# Altium PCB PCB1.PcbDoc (part 2 of 2)
Units mil, origin at the board's own origin, x right, y up, seen from the top; angles counter-clockwise.
Board outline 6255 x 1985 mil, 4 copper layers (Top Layer, Mid Layer 1, Mid Layer 2, Bottom Layer), stack 61.811 mil thick; 94 components, 195 nets, 609 pads, 417 vias.
Unrouted connection lines stored in the file: 4.
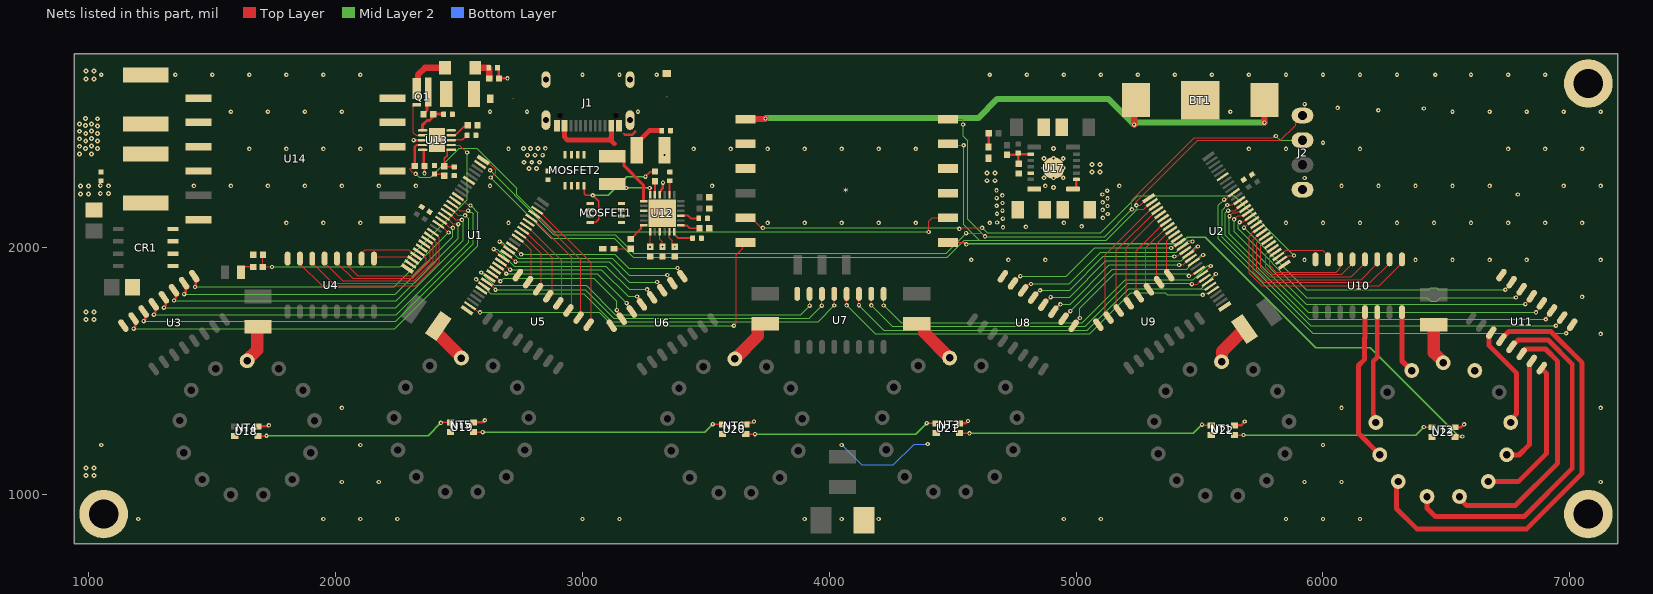
[diagram p4: the nets of this part, all layers, seen from the top]

## Via types
v1: diameter 17.72, hole 7.87, Top Layer to Bottom Layer, tented both sides, 331 vias
v2: diameter 19.68, hole 7.87, Top Layer to Bottom Layer, tented both sides, 75 vias
v3: diameter 19.68, hole 7.87, Top Layer to Bottom Layer, 11 vias

## Nets (pads, with @x,y where several pads share a name; then routed paths per layer and width w, separated by ;. In a path a pad name is that pad's centre, name@x,y a point inside that pad or via, vN(x,y) a via of type N, cw(c..) or ccw(c..) an arc to the next point about the centre after c; other vN are vias at no path point) (continued)
DP_5_2: NT2.4 U11.11 | length 424.4
  Top Layer w20: U11.11@6682.03,1655.14 6673.12,1646.23 6673.12,1601.88 6785,1490 6785,1326.33 6760.46,1301.79 NT2.4@6760.46,1290.97
DP_5_3: NT2.5 U11.15 | length 452.6
  Top Layer w20: NT2.5@6744.55,1160.32 6745.45,1159.42 6794.42,1159.42 6836.26,1201.26 6836.26,1530.82 U11.15@6845.86,1540.42
DP_5_4: NT2.6 U11.16 | length 637.1
  Top Layer w20: NT2.6@6669.74,1052.03 6670.65,1051.13 6791.13,1051.13 6905,1165 6905,1490 6886.82,1508.18 U11.16@6886.82,1511.74
DP_5_5: NT2.7 U11.14 | length 1077.7
  Top Layer w20: NT2.7@6553.19,990.91 6553.19,982.63 6580.82,955 6780,955 6950.79,1125.79 6950.79,1539.21 6901.42,1588.58 6821.25,1588.58 6804.9,1572.23 U11.14@6804.9,1569.1
DP_5_6: NT2.8 U11.13 | length 1452.7
  Top Layer w20: NT2.8@6421.58,990.94 6421.58,943.42 6455,910 6815,910 7010,1105 7010,1527.69 6912.69,1625 6791.16,1625 6778.34,1612.18 6775.21,1612.18 6763.94,1600.91 U11.13@6763.94,1597.78
DP_5_7: NT2.9 U11.12 | length 1835.4
  Top Layer w20: NT2.9@6305.05,1052.13 6297.4,1044.48 6297.4,942.6 6380,860 6825,860 7050,1085 7050,1532.68 6923.23,1659.45 6752.85,1659.45 6722.99,1629.59 U11.12@6722.99,1626.46
DP_5_8: NT2.10 U10.13 | length 623.8
  Top Layer w20: U10.13@6170,1737.72 6170,1633.63 6167.99,1631.62 6167.99,1545.94 6144,1521.95 6144,1246.77 NT2.10@6230.31,1160.46
DP_5_9: NT2.11 U10.14 | length 457.8
  Top Layer w20: NT2.11@6214.46,1291.11 6206.81,1298.77 6206.81,1319.76 6203.74,1322.83 6203.74,1538.74 6220,1555 U10.14@6220,1737.72
DP_5_L: NT2.2
DP_5_R: NT2.13 U10.16 | length 252.4
  Top Layer w20: U10.16@6320,1737.72 6320,1540.28 NT2.13@6358.84,1501.44
FB: R5.1 R7.1 U13.2 | length 1259.9
  Top Layer w5: R7.1@1705.28,1971.17 1704.97,1970.86 R5.1@1704.97,1921.17 v1(1742.04,1921.17) ; U13.2@2467.7,2415.32 2500.04,2415.32 2530.28,2385.08 v1(2532.62,2385.08)
  Mid Layer 2 w5: v1(1742.04,1921.17) 2260.74,1921.17 2532.62,2193.05 v1(2532.62,2385.08)
GND: *.2 *.3 *.13 BT1.1 C1.1 C2.1 C3.1 C4.2 C5.2 C6.1 C7.1 C9.2 C10.2 C11.2 C12.2 C13.2 C14.2 C15.1 C16.1 C18.1 C19.1 C20.2 C21.2 C22.2 C23.2 C24.2 D1.2 D2.2 D3.2 J1.A1_B12 J1.B1_A12 J1.S1 J1.S2 J1.S3 J1.S4 J2.4 pad.3 R6.2 R7.2 R8.1 R12.1 R13.1 R14.1 R15.1 R16.2 R17.2 R27.2 U1.6 U1.11 U1.23 U1.27 U1.28 U1.29 U1.34 U1.39 U1.51 U2.6 U2.11 U2.23 U2.28 U2.29 U2.34 U2.39 U2.51 U3.8 U4.8 U5.8 U6.8 U7.8 U8.8 U9.8 U10.8 U11.8 U12.3 U12.25 U13.5 U13.11 U14.1 U15.2 U16.2 U17.12 U17.15 U18.2 U19.2 U20.2 U21.2 U22.2 U23.2 | length 531.7
  Top Layer w5: 3163.85,2461.99 3170.28,2461.99 ; 3214.01,2469.98 3214.01,2475.04 ; 5494.94,1830.57 5531.29,1830.57 U2.23@5543.93,1843.22
  Top Layer w10: 3170.28,2457.68 3201.71,2457.68 3214.01,2469.98
  Bottom Layer w5: v1(4050,1200) 4130.91,1119.09 4259.84,1119.09 4344.49,1203.74 v1(4398.62,1203.74)
  other v1: 1200,900 1950,900 2100,900 2250,900 3000,900 3150,900 3900,900 4050,900 4200,900 4950,900 5100,900 5850,900 6000,900 6150,900 2025,1050 2175,1050 5925,1050 6075,1050 7125,1050 1050,1200 2100,1200 6000,1200 2025,1350 6075,1350 7125,1350 7125,1650 7050,1800 4575,1950 4725,1950 4875,1950 5925,1950 6375,1950 6525,1950 6675,1950 6825,1950 7125,1950 1800,2100 1950,2100 2100,2100 2700,2100 3750,2100 3900,2100 4050,2100 4200,2100 4350,2100 4650,2100 4950,2100 5850,2100 6000,2100 6150,2100 6300,2100 6450,2100 6600,2100 6750,2100 6900,2100 7050,2100 6789.7,2214.68 1425,2250 1575,2250 1725,2250 1875,2250 2025,2250 2175,2250 2325,2250 2625,2250 3525,2250 4875,2250 5175,2250 6075,2250 6225,2250 6375,2250 6525,2250 6675,2250 6975,2250 7125,2250 5925.49,2281.61 1650,2400 1800,2400 1950,2400 2100,2400 2700,2400 3450,2400 3600,2400 3750,2400 3900,2400 4050,2400 4200,2400 4350,2400 5700,2400 5850,2400 6150,2400 6750,2400 6900,2400 7050,2400 6000.29,2424.33 1575,2550 1725,2550 1875,2550 2025,2550 2625,2550 2775,2550 3225,2550 5625,2550 6525,2550 6675,2550 6825,2550 6975,2550 7125,2550 6224.71,2556.23 6408.78,2563.12 6059.35,2566.07 5925.49,2580.83 1050,2700 1350,2700 1500,2700 1650,2700 1800,2700 1950,2700 2100,2700 3000,2700 3150,2700 3300,2700 4650,2700 4800,2700 4950,2700 5100,2700 5250,2700 5400,2700 5550,2700 5700,2700 5850,2700 6000,2700 6150,2700 6300,2700 6455.04,2699.93 6600,2700 6750,2700 6900,2700
  other v2: 988.32,1075.75 1020.8,1075.75 988.32,1107.25 1020.8,1107.25 988.32,1707.64 1020.8,1707.64 988.32,1739.14 1020.8,1739.14 965.55,2217.52 998.03,2217.52 1046.26,2218.5 1078.74,2218.5 965.55,2249.02 998.03,2249.02 1078.74,2250 1046.26,2250.98 4638.91,2270.64 4671.39,2270.64 4638.91,2302.13 4671.39,2302.13 5064.53,2305.31 5097.01,2305.31 5064.53,2336.81 5097.01,2336.81 988.32,2683.04 1020.8,2683.04 988.32,2714.53 1020.8,2714.53
  other v3: 4908.46,2243.11 4869.09,2282.48 4908.46,2282.48 4947.83,2282.48 4869.09,2321.85 4908.46,2321.85 4947.83,2321.85 4869.09,2361.22 4908.46,2361.22 4947.83,2361.22 4908.46,2400.59
IO_0_0: U1.17 U3.1 | length 1202.4
  Top Layer w5: U1.17@2432.07,2082.66 2434.5,2082.66 2456.14,2061.02 v1(2457.68,2061.02)
  Top Layer w10: U3.1@1426.72,1884.16 1433.71,1877.17 1433.71,1843.71 v1(1430,1840)
  Mid Layer 2 w5: v1(1430,1840) 2236.65,1840 v1(2457.68,2061.02)
IO_0_1: U1.19 U4.7 | length 796.7
  Top Layer w5: U4.7@1855,1955 1855,1935 1945,1845 2325,1845 2420,1940 2420,2038.52 2396.4,2062.12 U1.19@2393.25,2062.12
IO_0_2: U1.20 U4.6 | length 706.7
  Top Layer w5: U4.6@1905,1955 1905,1935 1908.27,1935 1988.27,1855 2320,1855 2407.96,1942.96 2407.96,2020 2402.13,2025.82 2402.13,2026.38 2382.52,2045.99 U1.20@2381.96,2045.99
IO_0_3: U1.21 U4.5 | length 617.4
  Top Layer w5: U4.5@1955,1955 1955,1938.27 2028.27,1865 2315.19,1865 2395,1944.81 2395,2009.12 2374.25,2029.87 U1.21@2370.67,2029.87
IO_0_4: U1.14 U3.4 | length 1532
  Top Layer w5: U1.14@2449.71,2142.74 2455.12,2142.74 2485.66,2112.2 v1(2510.83,2112.2)
  Top Layer w10: v1(1303.84,1756.16) 1303.84,1758.24 1310.84,1765.23 1310.84,1791.13 U3.4@1303.84,1798.12
  Mid Layer 2 w5: v1(1303.84,1756.16) 2243.36,1756.16 2515.75,2028.54 2515.75,2103.84 2510.83,2108.76 v1(2510.83,2112.2)
IO_0_5: U1.13 U3.5 | length 1634.3
  Top Layer w5: U1.13@2461,2158.87 2466.41,2158.87 2495.02,2130.26 v1(2524.61,2130.26)
  Top Layer w10: v1(1262.89,1727.89) 1262.89,1729.98 1269.88,1736.97 1269.88,1762.45 U3.5@1262.89,1769.44
  Mid Layer 2 w5: v1(1262.89,1727.89) 2244.62,1727.89 2538.39,2021.65 2538.39,2116.49 v1(2524.61,2130.26)
IO_0_6: U1.12 U3.6 | length 1732
  Top Layer w5: U1.12@2472.29,2174.99 2477.7,2174.99 2503.05,2149.65 v1(2536.45,2149.65)
  Top Layer w10: v1(1221.93,1701.93) 1221.93,1704.02 1228.92,1711.01 1228.92,1733.77 U3.6@1221.93,1740.76
  Mid Layer 2 w5: v1(1221.93,1701.93) 2244.25,1701.93 2557.09,2014.76 2557.09,2136.81 2550.21,2143.68 2545.85,2143.68 2539.89,2149.65 v1(2536.45,2149.65)
IO_0_7: U1.10 U3.7 | length 1821.8
  Top Layer w5: U1.10@2494.87,2207.24 2500.29,2207.24 2534.82,2172.71 2543.83,2172.71 v1(2546.26,2170.28)
  Top Layer w10: v1(1180.97,1670.97) 1180.97,1673.06 1187.96,1680.05 1187.96,1705.09 U3.7@1180.97,1712.08
  Mid Layer 2 w5: v1(1180.97,1670.97) 2238.89,1670.97 2574.8,2006.89 2574.8,2141.73 v1(2546.26,2170.28)
IO_0_8: U1.15 U3.3 | length 1432.8
  Top Layer w5: U1.15@2438.42,2126.62 2443.83,2126.62 2474.37,2096.08 2494.97,2096.08 v1(2496.39,2094.67)
  Top Layer w10: v1(1344.8,1785.2) 1344.8,1787.29 1351.79,1794.28 1351.79,1819.81 U3.3@1344.8,1826.8
  Mid Layer 2 w5: v1(1344.8,1785.2) 2244.84,1785.2 2497.05,2037.4 2497.05,2094.01 v1(2496.39,2094.67)
IO_0_9: U1.16 U3.2 | length 1331.9
  Top Layer w5: U1.16@2427.13,2110.49 2432.54,2110.49 2460.88,2082.16 2471.98,2082.16 v1(2474.41,2079.72)
  Top Layer w10: v1(1385.76,1810.76) 1385.76,1812.85 1392.75,1819.84 1392.75,1848.49 U3.2@1385.76,1855.48
  Mid Layer 2 w5: v1(1385.76,1810.76) 2241.86,1810.76 2474.41,2043.31 v1(2474.41,2079.72)
IO_1_0: U1.25 U4.2 | length 257.6
  Top Layer w5: U4.2@2105,1955 2105,1976.06 2118.98,1990.04 2194.96,1990.04 2195,1990 2295.46,1990 2320.09,1965.37 U1.25@2325.51,1965.37
IO_1_1: U1.47 U5.7 | length 209.1
  Top Layer w5: U1.47@2736.75,2037.88 2742.16,2037.88 2791.34,1988.7 2791.34,1871.78 U5.7@2779.14,1859.58
IO_1_2: U1.48 U5.6 | length 266.5
  Top Layer w5: U1.48@2748.04,2054.01 2753.45,2054.01 2832.68,1974.78 2832.68,1843.48 U5.6@2820.1,1830.9
IO_1_3: U1.53 U5.2 | length 506.8
  Top Layer w5: U1.53@2804.49,2134.63 2809.91,2134.63 2993.53,1951.01 2993.53,1732.82 2997.05,1729.3 U5.2@2983.93,1716.18
IO_1_4: U1.54 U5.1 | length 561
  Top Layer w5: U1.54@2815.78,2150.76 2821.2,2150.76 3034.48,1937.47 3034.48,1697.1 U5.1@3024.89,1687.51
IO_1_5: U1.52 U5.3 | length 449.4
  Top Layer w5: U1.52@2793.2,2118.51 2798.62,2118.51 2955.71,1961.41 2955.71,1757.6 U5.3@2942.97,1744.86
IO_1_6: U1.50 U5.4 | length 382.2
  Top Layer w5: U1.50@2770.62,2086.26 2776.03,2086.26 2916.34,1945.95 2916.34,1799.49 2915.17,1798.32 2915.17,1786.7 U5.4@2902.01,1773.54
IO_1_7: U1.49 U5.5 | length 326.4
  Top Layer w5: U1.49@2759.33,2070.13 2764.74,2070.13 2876.97,1957.91 2876.97,1827.28 2861.06,1811.37 U5.5@2861.06,1802.22
IO_1_8: U1.22 U4.4 | length 531.6
  Top Layer w5: U4.4@2005,1955 2005,1935 2008.27,1935 2068.27,1875 2312.46,1875 2382.93,1945.47 2382.93,1992.99 2362.18,2013.74 U1.22@2359.38,2013.74
IO_1_9: U1.24 U4.3 | length 437.5
  Top Layer w5: U4.3@2055,1955 2055,1920 2089.9,1885.1 2309.83,1885.1 2366.57,1941.84 2366.57,1954.95 2365.11,1956.42 2365,1956.52 2364.89,1956.62 2355.68,1964.77 U1.24@2336.8,1981.49
IO_1_R: U1.26 U4.1 | length 167.3
  Top Layer w5: U4.1@2155,1955 2161.89,1961.89 2301.57,1961.89 U1.26@2314.22,1949.24
IO_2_0: U1.45 U6.1 | length 748.9
  Top Layer w5: U1.45@2714.17,2005.63 2718.69,2005.63 2750.98,1973.33 v1(2750.98,1972.44) ; v1(3384.84,1916.76) 3387.28,1914.33 3387.28,1910.65 3404.65,1893.27 U6.1@3404.65,1884.12
  Mid Layer 2 w5: v1(2750.98,1972.44) 3130.91,1972.44 3186.59,1916.76 v1(3384.84,1916.76)
IO_2_1: U1.37 U7.7 | length 1507.1
  Top Layer w5: v1(2589.57,1898.62) 2595.49,1898.62 2617.48,1876.63 U1.37@2623.84,1876.63 ; v1(3920,1764.49) U7.7@3920,1812.28
  Mid Layer 2 w5: v1(2589.57,1898.62) 2641.36,1846.83 3014.88,1846.83 3133.36,1728.35 3883.86,1728.35 v1(3920,1764.49)
IO_2_2: U1.36 U7.6 | length 1487.9
  Top Layer w5: U1.36@2612.55,1860.51 2616.92,1860.51 2647.64,1829.78 v1(2647.64,1828.74) ; v1(3970,1764.29) U7.6@3970,1812.28
  Mid Layer 2 w5: v1(2647.64,1828.74) 3011.81,1828.74 3126.97,1713.58 3919.29,1713.58 v1(3970,1764.29)
IO_2_3: U1.35 U7.5 | length 1639.8
  Top Layer w5: v1(2568.9,1871.06) 2569.03,1871.06 2595.58,1844.51 2595.58,1844.38 U1.35@2601.26,1844.38 ; v1(4020,1765.08) U7.5@4020,1812.28
  Mid Layer 2 w5: v1(2568.9,1871.06) 2627.58,1812.38 3005.53,1812.38 3118.11,1699.8 3954.72,1699.8 v1(4020,1765.08)
IO_2_4: U1.42 U6.4 | length 790.9
  Top Layer w5: v1(2639.76,1993.11) 2675.62,1957.26 U1.42@2680.29,1957.26 U1.42@2685.46,1957.26 ; v1(3261.98,1830.71) 3264.42,1828.28 3264.42,1824.6 3281.78,1807.24 U6.4@3281.78,1798.09
  Mid Layer 2 w5: v1(2639.76,1993.11) 2654.64,1993.11 2723.04,1924.71 3094.97,1924.71 3188.98,1830.71 v1(3261.98,1830.71)
IO_2_5: U1.41 U6.5 | length 650.5
  Top Layer w5: U1.41@2669,1941.13 2675.02,1941.13 2705.84,1910.31 v1(2706.44,1910.31) ; v1(3221.46,1801.6) 3223.89,1799.17 3223.89,1795.49 3240.82,1778.56 U6.5@3240.82,1769.41
  Mid Layer 2 w5: v1(2706.44,1910.31) 3075.91,1910.31 3184.62,1801.6 v1(3221.46,1801.6)
IO_2_6: U1.40 U6.6 | length 627
  Top Layer w5: U1.40@2657.71,1925.01 2661.38,1925.01 2690.94,1895.44 v1(2690.94,1893.7) ; v1(3178.81,1774.61) 3181.25,1772.17 3181.25,1768.49 3199.86,1749.88 U6.6@3199.86,1740.73
  Mid Layer 2 w5: v1(2690.94,1893.7) 3059.72,1893.7 v1(3178.81,1774.61)
IO_2_7: U1.38 U6.7 | length 639.5
  Top Layer w5: U1.38@2635.13,1892.76 2639.15,1892.76 2667.32,1864.58 v1(2667.32,1863.19) ; v1(3138.78,1746.06) 3141.21,1743.63 3141.21,1738.89 3158.91,1721.2 U6.7@3158.91,1712.05
  Mid Layer 2 w5: v1(2667.32,1863.19) 2680.12,1875.98 3045.28,1875.98 3138.78,1782.48 v1(3138.78,1746.06)
IO_2_8: U1.43 U6.3 | length 699.4
  Top Layer w5: U1.43@2691.58,1973.38 2697.25,1973.38 2728.09,1942.54 v1(2728.35,1942.54) ; v1(3302.09,1860.24) 3304.53,1857.8 3304.53,1854.12 3322.74,1835.91 U6.3@3322.74,1826.77
  Mid Layer 2 w5: v1(2728.35,1942.54) 2728.96,1941.93 3107.28,1941.93 3188.98,1860.24 v1(3302.09,1860.24)
IO_2_9: U1.44 U6.2 | length 829.4
  Top Layer w5: v1(2664.37,2023.62) 2664.37,2023.11 2697.97,1989.51 U1.44@2702.87,1989.51 ; v1(3343.5,1888.46) 3345.94,1886.03 3345.94,1882.35 3363.69,1864.59 U6.2@3363.69,1855.44
  Mid Layer 2 w5: v1(2664.37,2023.62) 2666.8,2021.19 2674.02,2021.19 2739.13,1956.08 3120.69,1956.08 3188.31,1888.46 v1(3343.5,1888.46)
IO_3_0: U2.21 U7.2 | length 1493.1
  Top Layer w5: U7.2@4170,1812.28 4170,1766.02 v1(4170.28,1765.75) ; v1(5468.5,1851.38) 5490.23,1851.38 5502.91,1864.06 U2.21@5503.4,1864.06
  Mid Layer 2 w5: v1(4170.28,1765.75) 4254.92,1681.1 5036.42,1681.1 5209.65,1854.33 5465.55,1854.33 v1(5468.5,1851.38)
IO_3_1: U2.12 U8.7 | length 727.2
  Top Layer w5: U8.7@4744.14,1854.58 4744.14,1856.63 4771.57,1884.06 v1(4773.62,1884.06) ; v1(5384.84,1997.91) 5386.13,1997.91 5390.66,2002.43 5391.3,2002.43 5396.5,2007.63 5404.22,2007.63 U2.12@5404.79,2007.06
  Mid Layer 2 w5: v1(4773.62,1884.06) 4959.85,1884.06 5075.79,2000 5382.75,2000 v1(5384.84,1997.91)
IO_3_2: U2.13 U8.6 | length 805.2
  Top Layer w5: U8.6@4785.1,1825.9 4785.1,1828.21 4809.25,1852.36 v1(4816.93,1852.36) ; U2.13@5443.36,2015.07 5445.72,2017.43 5460.97,2017.43 5468.02,2024.48 v1(5471.46,2024.48)
  Mid Layer 2 w5: v1(4816.93,1852.36) 4971.46,1852.36 5100.64,1981.55 5405.76,1981.55 5452.6,2028.39 5457.6,2028.39 5459.07,2026.91 5469.02,2026.91 v1(5471.46,2024.48)
IO_3_3: U2.17 U8.2 | length 701.8
  Top Layer w5: U8.2@4948.93,1711.18 4948.93,1714.99 4976.07,1742.13 v1(4976.38,1742.13) ; U2.17@5494.7,1953.54 5498.81,1953.54 v1(5514.76,1969.49)
  Mid Layer 2 w5: v1(4976.38,1742.13) 5145.67,1911.42 5448.82,1911.42 5506.89,1969.49 v1(5514.76,1969.49)
IO_3_4: U2.19 U8.1 | length 614.2
  Top Layer w5: U8.1@4989.89,1682.51 4989.89,1689.69 4991.42,1689.69 5014.76,1713.03 v1(5014.76,1714.57) ; v1(5456.69,1884.84) 5459.13,1887.28 5468.87,1887.28 5476.21,1894.62 U2.19@5481.57,1894.62
  Mid Layer 2 w5: v1(5014.76,1714.57) 5014.76,1753.94 5153.54,1892.72 5448.82,1892.72 v1(5456.69,1884.84)
IO_3_5: U2.16 U8.3 | length 648.2
  Top Layer w5: U8.3@4907.97,1739.86 4907.97,1742.8 4934.85,1769.68 v1(4936.02,1769.68) ; v1(5417.32,1929.13) 5418.48,1930.29 5433.68,1930.29 5459.48,1956.09 U2.16@5464.9,1956.09
  Mid Layer 2 w5: v1(4936.02,1769.68) 4975.39,1769.68 5134.84,1929.13 v1(5417.32,1929.13)
IO_3_6: U2.15 U8.4 | length 756.2
  Top Layer w5: U8.4@4867.01,1769.57 v1(4896.65,1799.21) ; U2.15@5468.47,1983.78 5471.76,1983.78 5491.92,2003.94 v1(5493.11,2003.94)
  Mid Layer 2 w5: v1(4896.65,1799.21) 4973.43,1799.21 5120.08,1945.87 5426.18,1945.87 5484.25,2003.94 v1(5493.11,2003.94)
IO_3_7: U2.14 U8.5 | length 673.7
  Top Layer w5: U8.5@4826.06,1797.22 4826.06,1799.91 4852.91,1826.77 v1(4854.33,1826.77) ; v1(5397.64,1963.58) 5399.77,1965.71 5414,1965.71 5422.62,1974.34 U2.14@5422.62,1976.5
  Mid Layer 2 w5: v1(4854.33,1826.77) 4973.43,1826.77 5110.24,1963.58 v1(5397.64,1963.58)
IO_3_8: U2.24 U7.4 | length 1636.4
  Top Layer w5: v1(4069.88,1765.75) 4070,1765.87 U7.4@4070,1812.28 ; v1(5512.93,1808.44) 5516.38,1808.44 5522.07,1814.13 5535.5,1814.13 U2.24@5536.15,1813.47
  Mid Layer 2 w5: v1(4069.88,1765.75) 4186.02,1649.61 5054.13,1649.61 5221.46,1816.93 5361.23,1816.93 5369.72,1808.44 v1(5512.93,1808.44)
IO_3_9: U2.22 U7.3 | length 1676.4
  Top Layer w5: U7.3@4120,1812.28 4120,1766.81 v1(4120.08,1766.73) ; U2.22@5532.64,1859.34 5535.31,1859.34 5565.94,1889.97 v1(5565.94,1892.72)
  Mid Layer 2 w5: v1(4120.08,1766.73) 4221.46,1665.35 5044.29,1665.35 5212.6,1833.66 5506.89,1833.66 v1(5565.94,1892.72)
IO_3_R: U2.20 U7.1 | length 1547.1
  Top Layer w5: v1(4220,1765.24) U7.1@4220,1812.28 ; U2.20@5510.06,1891.59 5513.57,1891.59 5545.28,1923.3 v1(5545.28,1925.2)
  Mid Layer 2 w5: v1(4220,1765.24) 4290.35,1694.88 5024.73,1694.88 5198.33,1868.48 5474.78,1868.48 5531.5,1925.2 v1(5545.28,1925.2)
IO_4_0: U2.10 U9.1 | length 184.1
  Top Layer w5: U9.1@5376.82,1888.26 5367.22,1897.85 5367.22,2028.32 5391.74,2052.84 U2.10@5397.15,2052.84
IO_4_1: U2.31 U10.7 | length 238.1
  Top Layer w5: U2.31@5819.68,1964.2 5825.09,1964.2 5850.06,1989.17 5999.84,1989.17 6015.91,1973.11 6020,1973.11 U10.7@6020,1952.28
IO_4_2: U2.32 U10.6 | length 405.6
  Top Layer w5: U2.32@5808.39,1980.33 5801.2,1980.33 5784.45,1963.58 5784.45,1927.17 5810.88,1900.73 6053.29,1900.73 6070,1917.44 U10.6@6070,1952.28
IO_4_3: U2.33 U10.5 | length 489.7
  Top Layer w5: U2.33@5797.1,1996.45 5791.68,1996.45 5768.7,1973.47 5768.7,1919.29 5796.26,1891.73 6076.18,1891.73 6120,1935.55 U10.5@6120,1952.28
IO_4_4: U2.7 U9.4 | length 356.4
  Top Layer w5: U9.4@5253.94,1802.22 5243.11,1813.05 5244.35,1814.29 5244.35,1987.7 5357.86,2101.22 U2.7@5363.28,2101.22
IO_4_5: U2.5 U9.5 | length 422.8
  Top Layer w5: U9.5@5212.99,1773.54 5203.39,1783.14 5203.39,1999.65 5337.21,2133.47 U2.5@5340.7,2133.47
IO_4_6: U2.4 U9.6 | length 483.5
  Top Layer w5: U9.6@5172.03,1744.86 5159.45,1757.44 5162.43,1760.42 5162.43,1988.03 5323.99,2149.59 U2.4@5329.41,2149.59
IO_4_7: U2.3 U9.7 | length 541.7
  Top Layer w5: U9.7@5131.07,1716.18 5117.91,1729.34 5117.91,1741.35 5117.13,1742.13 5117.13,1970.14 5312.7,2165.72 U2.3@5318.11,2165.72
IO_4_8: U2.8 U9.3 | length 300.7
  Top Layer w5: U9.3@5294.9,1830.9 5282.48,1843.32 5282.48,1998.42 5369.15,2085.09 U2.8@5374.57,2085.09
IO_4_9: U2.9 U9.2 | length 244.1
  Top Layer w5: U9.2@5335.86,1859.58 5322.83,1872.6 5326.26,1876.03 5326.26,2014.78 5380.45,2068.97 U2.9@5385.86,2068.97
IO_5_0: U2.37 U10.2 | length 770
  Top Layer w5: U2.37@5731.35,2046.3 5716.54,2031.49 5716.54,1902.56 5760.83,1858.27 6191.93,1858.27 6270,1936.34 U10.2@6270,1952.28
IO_5_1: U2.40 U11.7 | length 1236
  Top Layer w5: v1(5680.12,2080.71) 5682.07,2080.71 5697.24,2095.88 U2.40@5699.04,2095.88 ; v1(6739.17,1828.74) 6739.17,1830.71 6764.14,1855.68 U11.7@6764.14,1859.58
  Mid Layer 2 w5: v1(5680.12,2080.71) 5932.09,1828.74 6430.17,1828.74 6437.59,1836.16 6460.05,1836.16 6467.47,1828.74 v1(6739.17,1828.74)
IO_5_2: U2.41 U11.6 | length 1357.5
  Top Layer w5: v1(5662.4,2102.36) 5664.83,2104.8 5677.09,2104.8 5684.16,2111.87 5686.13,2111.87 U2.41@5689.21,2108.78 ; v1(6781.5,1797.24) 6781.5,1801.18 6805.1,1824.78 U11.6@6805.1,1830.9
  Mid Layer 2 w5: v1(5662.4,2102.36) 5656.5,2096.46 5656.5,2075.79 5935.04,1797.24 6422.3,1797.24 6437.59,1781.95 6460.05,1781.95 6475.34,1797.24 v1(6781.5,1797.24)
IO_5_3: U2.45 U11.2 | length 1719.3
  Top Layer w5: v1(5612.2,2172.24) 5633.62,2172.24 5638.37,2176.99 5642.19,2176.99 U2.45@5644.38,2174.81 ; v1(6943.9,1683.07) 6943.9,1685.06 6966.94,1708.1 6968.93,1708.1 U11.2@6968.93,1716.18
  Mid Layer 2 w5: v1(5612.2,2172.24) 5591.54,2151.57 5591.54,2042.32 5950.79,1683.07 v1(6943.9,1683.07)
IO_5_4: U2.47 U11.1 | length 1808
  Top Layer w5: v1(5599.41,2193.9) 5601.84,2196.33 5608.47,2196.33 U2.47@5620.11,2207.98 ; v1(6985.24,1652.56) 6985.24,1658.75 7009.89,1683.4 U11.1@7009.89,1687.51
  Mid Layer 2 w5: v1(5599.41,2193.9) 5575.79,2170.28 5575.79,2035.43 5957.2,1654.02 5958.66,1652.56 5962.8,1652.56 6587.58,1653.09 cw(c6587.6,1629.92) 6587.63,1653.09 v1(6985.24,1652.56)
IO_5_5: U2.44 U11.3 | length 1669.4
  Top Layer w5: v1(5615.86,2149.08) 5642.44,2149.08 5667.19,2173.83 U2.44@5672.9,2173.83 ; v1(6902.56,1708.66) 6902.56,1715.34 6927.97,1740.75 U11.3@6927.97,1744.86
  Mid Layer 2 w5: 5624.94,2151.51 5618.29,2151.51 v1(5615.86,2149.08) 5613.01,2149.08 5604.7,2140.77 5604.7,2048.84 5944.88,1708.66 v1(6902.56,1708.66)
IO_5_6: U2.43 U11.4 | length 1567.1
  Top Layer w5: v1(5621.06,2126.97) 5634.18,2140.08 5646.17,2140.08 5650.95,2144.87 5671.35,2144.87 U2.43@5684.19,2157.7 ; v1(6863.19,1737.2) 6863.19,1740.65 6887.01,1764.47 U11.4@6887.01,1773.54
  Mid Layer 2 w5: v1(5621.06,2126.97) 5621.06,2056.1 5939.96,1737.2 v1(6863.19,1737.2)
IO_5_7: U2.42 U11.5 | length 1440.6
  Top Layer w5: v1(5639.81,2114.14) 5654.6,2128.93 5676.43,2128.93 U2.42@5678.77,2126.59 ; v1(6819.88,1770.67) 6819.88,1771.3 6845.42,1796.84 6846.06,1796.84 U11.5@6846.06,1802.22
  Mid Layer 2 w5: v1(5639.81,2114.14) v1(5639.81,2114.14) 5639.76,2063.98 5933.07,1770.67 v1(6819.88,1770.67)
IO_5_8: U2.35 U10.4 | length 576.5
  Top Layer w5: U2.35@5754.08,2013.19 5753.28,2013.99 5753.03,2013.99 5748.03,2008.99 5748.03,1917.32 5784.45,1880.91 6115.35,1880.91 6170,1935.55 U10.4@6170,1952.28
IO_5_9: U2.36 U10.3 | length 675.5
  Top Layer w5: U2.36@5743.32,2031.7 5743.32,2030.33 5731.3,2018.32 5731.3,1910.43 5771.65,1870.08 6154.53,1870.08 6220,1935.55 U10.3@6220,1952.28
IO_5_R: U2.38 U10.1 | length 871.9
  Top Layer w5: U2.38@5721.21,2062.55 5720.76,2063.01 5718.52,2063.01 5700.79,2045.28 5700.79,1896.65 5752.95,1844.49 6228.94,1844.49 6320,1935.55 U10.1@6320,1952.28
Net*_5: *.5 | length 2464.2
  Top Layer w5: *.5@3673.07,2127.53 3675.57,2127.53 3723.37,2079.72 v1(3730.32,2079.72) ; v1(4526.57,2075.79) 4530.51,2079.72 v1(4619.09,2079.72) ; 5830.97,1948.08 5837.7,1948.08 5857.14,1967.52 v1(5882.87,1967.52)
  Mid Layer 2 w5: v1(3730.32,2079.72) 4519.2,2079.72 4523.13,2075.79 v1(4526.57,2075.79) ; v1(4619.09,2079.72) 4639.31,2059.51 5098.88,2059.51 5249.63,2210.26 5640.14,2210.26 v1(5882.87,1967.52)
Net*_6: *.6 | length 1458.5
  Top Layer w5: 2544.8,1763.76 2550.22,1763.76 2576.77,1737.2 v1(2584.65,1737.2) ; v1(3613.19,1683.07) 3613.19,1686.51 3622.82,1696.14 3622.82,1970.26 3648.62,1996.06 3648.62,2008.58 *.6@3660.32,2020.28
  Mid Layer 2 w5: v1(2584.65,1737.2) 3067.98,1737.2 3122.11,1683.07 v1(3613.19,1683.07)
Net*_10: *.10 | length 2464.7
  Top Layer w6: *.10@4480.31,2020.28 4546.44,2020.28 4554.15,2012.56 v1(4555.12,2012.56) ; 6535.19,1232.28 6562.99,1232.28 v1(6564.96,1234.25)
  Mid Layer 2 w6: v1(4555.12,2012.56) 4557.32,2014.76 5423.23,2014.76 5449.8,2041.34 5523.65,2041.34 5970.59,1594.4 6191.03,1594.4 6551.18,1234.25 v1(6564.96,1234.25)
Net*_11: *.11 | length 2451.3
  Top Layer w5: 2301.02,2321.87 2301.02,2314.51 2307.8,2307.73 2310.87,2307.73 2320.38,2298.23 v1(2323.82,2298.23) ; v1(4402.5,2062.99) 4402.5,2106.24 4416.54,2120.28 *.11@4480.31,2120.28
  Mid Layer 2 w5: v1(2323.82,2298.23) 2337.66,2284.39 2384.18,2284.39 2501.23,2401.44 2571.99,2401.44 2734.22,2239.21 2734.22,2214.6 2885.83,2062.99 v1(4402.5,2062.99)
Net*_12: *.12
Net*_14: *.14 J2.1 | length 4336.2
  Top Layer w5: 2597.84,2354.3 2607.81,2354.3 2647.54,2314.58 2647.54,2303.05 v1(2627.95,2283.46) ; *.14@4480.31,2420.28 4486.22,2414.37 v1(4544.29,2414.37) ; 5294.18,2199.9 5289.34,2199.9 5260.7,2171.26 v1(5244.09,2171.26) 5244.09,2186.02 5492.13,2434.06 5827.76,2434.06 5888.78,2495.08 5888.78,2503.4 5917.32,2531.95 J2.1@5917.32,2534.84
  Mid Layer 2 w5: v1(2627.95,2283.46) 2874.02,2037.4 3128.94,2037.4 3205.71,1960.63 4477.85,1960.63 4546.14,2028.92 4607.89,2028.92 ; v1(4544.29,2414.37) 4544.29,2092.52 4607.89,2028.92 ; v1(5244.09,2171.26) 5246.53,2168.83 5246.53,2162.03 5246.58,2161.97 5246.58,2152.58 5244.24,2150.24 5232.17,2138.17 5122.92,2028.92 4607.89,2028.92
Net*_15: *.15 J2.2 | length 4341.9
  Top Layer w5: 2585.2,2336.24 2589.76,2336.24 ; v1@2623.55,2315.43 v1(2625.98,2312.99) ; *.15@4480.31,2520.28 4539.39,2520.28 4542.32,2517.35 v1(4542.32,2498.25) ; v1(4554.13,2058.07) 4618.11,2058.07 v1(4630.91,2045.28) ; 5306.82,2181.84 5301.41,2181.84 5274.1,2154.53 v1(5225.39,2154.53) 5225.39,2191.93 5478.35,2444.88 5798.72,2444.88 5805.61,2451.77 v1(5809.06,2451.77)
  Mid Layer 2 w5: v1(2625.98,2312.99) 2725.22,2213.76 2725.22,2210.87 2883.93,2052.17 3132.87,2052.17 3207.68,1977.36 4473.43,1977.36 v1(4554.13,2058.07) ; v1(4542.32,2498.25) 4542.32,2450.79 4560.65,2432.46 4560.65,2115.04 4631.39,2044.29 5115.16,2044.29 v1(5225.39,2154.53) ; v1(5809.06,2451.77) 5825.98,2434.84 J2.2@5917.32,2434.84
NetC4_1: C4.1 R1.1 U13.1 | length 127.5
  Top Layer w6: U13.1@2467.7,2395.63 2453.16,2395.63 2451.39,2393.86 2451.39,2372.36 2440,2360.97 R1.1@2440,2329.68 2442.91,2326.77 C4.1@2480.32,2326.77
NetC5_1: C5.1 R1.2 | length 42.9
  Top Layer w6: C5.1@2400,2297.28 2433.03,2297.28 R1.2@2440,2290.31
NetC6_2: C6.2 R2.2 U13.6 | length 131.6
  Top Layer w12: U13.6@2352.3,2474.37 2352.3,2497.3 2370,2515 2380,2515 2390,2525 2390,2535.31 R2.2@2394.69,2540 C6.2@2437.28,2540
NetC7_2: C7.2 U13.3 | length 73.4
  Top Layer w6: U13.3@2467.7,2435 2468.38,2435.68 2512.96,2435.68 2524.46,2447.17 2525.44,2447.17 2532.28,2454.02 C7.2@2532.28,2455
NetC8_1: C8.1 D4.1 R28.1 | length 99.2
  Top Layer w25: D4.1@2564.96,2728.35 C8.1@2620.08,2728.35 2621.75,2726.67 2621.75,2685.33 R28.1@2622.05,2685.04
NetC12_1: C12.1 U12.20 | length 56.4
  Top Layer w8: U12.20@3352.37,2214.48 3353.07,2215.17 3353.07,2269.62 C12.1@3353.76,2270.32
NetC13_1: C13.1 U12.15 | length 77.3
  Top Layer w8: U12.15@3398.35,2129.14 3427.95,2129.14 3439.05,2118.03 C13.1@3471.04,2118.03
NetC14_1: C14.1 U12.12 | length 90.4
  Top Layer w5: 3435.04,2038.03 C14.1@3446.04,2038.03
  Top Layer w8: U12.12@3372.06,2063.48 3372.06,2053.48 3387.5,2038.03 3435.04,2038.03
NetC17_1: C17.1 R26.1 R27.1 U17.9 | length 143
  Top Layer w10: R26.1@4719.68,2375.54 4756.1,2375.54 C17.1@4762.99,2382.43 ; C17.1@4764.96,2383.42 4765.94,2383.42 4771.21,2378.15 U17.9@4815.94,2378.15 ; C17.1@4765.94,2382.43 4765.94,2340.11 R27.1@4766.93,2339.13
NetCR1_1: CR1.1 CR1.2 CR1.3 CR1.4 U14.12
NetD1_1: D1.1 R11.1 | length 67.4
  Top Layer w5: D1.1@3127.64,1995 R11.1@3195,1995
NetD3_1: D3.1 R25.1 | length 56.2
  Top Layer w10: D3.1@4644.69,2407.48 4645.27,2408.07 4645.27,2462.55 R25.1@4645.86,2463.14
NetMOSFET1_1: MOSFET1.1 MOSFET1.2 MOSFET1.3 MOSFET2.1 MOSFET2.2 MOSFET2.3
NetMOSFET1_4: MOSFET1.4 MOSFET2.4 R10.1 | length 508.1
  Top Layer w6: MOSFET2.4@3006.18,2250 3006.18,2219.21 3013.78,2211.61 v1(3041.34,2211.61) 3065.94,2187.01 3065.94,2114.17 3053.39,2101.61 MOSFET1.4@3032,2101.61 ; v1(3254.92,2287.4) 3275.24,2307.72 R10.1@3293.76,2307.72
  Mid Layer 2 w6: v1(3041.34,2211.61) 3104.33,2211.61 3180.12,2287.4 v1(3254.92,2287.4)
NetMOSFET1_5: MOSFET1.5 MOSFET1.6 MOSFET1.7 MOSFET1.8 R9.1 U12.24 | length 122
  Top Layer w6: v1(3271.65,2241.14) 3273.63,2239.16 U12.24@3273.63,2214.48
  Mid Layer 2 w6: v1(3177.17,2241.14) v1(3271.65,2241.14)
NetNT1_1: NT1.1 R19.1 | length 171.2
  Top Layer w50: NT1.1@5589.26,1537.03 5591.18,1538.94 5591.18,1578.61 R19.1@5682.27,1669.71
NetNT2_1: NT2.1 R20.1 | length 170.1
  Top Layer w50: R20.1@6448.82,1686.98 6448.82,1574.27 6487.45,1535.64 NT2.1@6487.45,1532.93
NetNT3_1: NT3.1 R21.1 | length 209.6
  Top Layer w50: R21.1@4354.33,1690.92 4381.92,1690.92 4384.57,1688.26 4384.57,1655.5 NT3.1@4487.45,1552.62
NetNT4_1: NT4.1 R22.1 | length 159.4
  Top Layer w50: NT4.1@1641,1538.1 NT4.1@1641,1540.81 1641,1543.51 1682.09,1584.6 1682.09,1676.45 1684.74,1679.11 R22.1@1685.04,1679.11
NetNT5_1: NT5.1 R23.1 | length 175.1
  Top Layer w50: R23.1@2416.15,1681.52 2407.68,1673.05 2407.68,1656.32 2509.26,1554.73 NT5.1@2509.26,1552.03
NetNT6_1: NT6.1 R24.1 | length 209.3
  Top Layer w50: NT6.1@3617.37,1548.68 3709.92,1641.22 3709.92,1688.26 3712.57,1690.92 R24.1@3740.16,1690.92
NetQ1_1: Q1.1 U13.7 | length 158.9
  Top Layer w5: Q1.1@2315,2578.99 2315,2465 2325.32,2454.68 U13.7@2352.3,2454.68 ; Q1.1@2328.77,2578.99 Q1.1@2331.14,2581.36
NetQ1_2: Q1.2 R2.1 R8.2 | length 104.8
  Top Layer w12: R2.1@2357.66,2537.66 R2.1@2355.32,2540 2370,2554.68 2370,2625 Q1.2@2375,2630 Q1.2@2377.34,2627.66
NetR3_1: R3.1 U13.9 | length 113
  Top Layer w8: 2320.32,2407.91 2327.76,2415.35 2352.26,2415.35 U13.9@2352.3,2415.32
  Top Layer w10: R3.1@2320.32,2330 2320.32,2407.91
NetR4_1: R4.1 R5.2 | length 63
  Top Layer w6: R4.1@1616.14,1899.61 1616.14,1907.44 1629.87,1921.17 R5.2@1665.6,1921.17
NetR6_1: R6.1 U13.4 | length 89.1
  Top Layer w6: U13.4@2467.7,2454.68 2483.2,2454.68 2484.97,2456.46 2486.46,2456.46 2521.72,2491.72 2530.2,2491.72 2532.13,2493.64 R6.1@2532.13,2502.13
NetR10_2: R10.2 U12.23 | length 54.1
  Top Layer w8: U12.23@3293.32,2214.48 3293.32,2267.91 R10.2@3293.76,2268.35
NetR11_2: R11.2 U12.6 | length 82.9
  Top Layer w8: R11.2@3195,2034.37 3236.35,2075.72 3236.35,2088.77 3237.35,2089.77 U12.6@3247.35,2089.77
NetR15_2: R15.2 U12.13 | length 80.3
  Top Layer w8: U12.13@3398.35,2089.77 3423.03,2089.77 3434.76,2078.03 R15.2@3473.76,2078.03
NetU1_1: U1.1 U2.1
NetU1_2: U1.2 U2.2
NetU1_30: U1.30
NetU2_30: U2.30
NetU18_3: U18.3 U19.1 | length 802.8
  Top Layer w6: U18.3@1684.8,1236.22 1718.5,1236.22 v1(1719.49,1237.2) ; v1(2426.18,1289.37) 2428.15,1291.34 U19.1@2464.81,1291.34
  Mid Layer 2 w6: v1(1719.49,1237.2) 2374.02,1237.2 v1(2426.18,1289.37)
NetU19_3: U19.3 U20.1 | length 1022.2
  Top Layer w6: U19.3@2558.81,1251.97 v1(2595.47,1251.97) ; v1(3527.56,1284.45) 3528.54,1283.46 U20.1@3567.17,1283.46
  Mid Layer 2 w6: v1(2595.47,1251.97) 3495.08,1251.97 v1(3527.56,1284.45)
NetU20_3: U20.3 U21.1 | length 790.9
  Top Layer w6: U20.3@3661.17,1244.09 v1(3698.82,1244.09) ; v1(4394.69,1288.39) 4395.67,1287.4 U21.1@4433.31,1287.4
  Mid Layer 2 w6: v1(3698.82,1244.09) 4350.39,1244.09 v1(4394.69,1288.39)
NetU21_3: U21.3 U22.1 | length 1036.5
  Top Layer w6: U21.3@4527.31,1248.03 4566.93,1248.03 v1(4567.91,1247.05) ; v1(5509.84,1282.48) 5512.8,1279.53 U22.1@5547.49,1279.53
  Mid Layer 2 w6: v1(4567.91,1247.05) 5474.41,1247.05 v1(5509.84,1282.48)
NetU22_3: U22.3 U23.1 | length 813.6
  Top Layer w6: U22.3@5641.49,1240.16 v1(5678.15,1240.16) ; v1(6408.46,1272.64) 6409.45,1271.65 U23.1@6441.19,1271.65
  Mid Layer 2 w6: v1(5678.15,1240.16) 6375.98,1240.16 v1(6408.46,1272.64)
NetU23_3: U23.3
SW_SRC: D4.2 Q1.3 U14.3 U14.4 U14.5 U14.6 | length 178.2
  Top Layer w25: Q1.3@2328.82,2644.65 2333.06,2648.89 2333.06,2699.2 2362.2,2728.35 D4.2@2442.91,2728.35
VBAT: *.1 BT1.2 | length 2375.8
  Top Layer w25: *.1@3660.32,2520.28 3738.78,2520.28 v1(3741.14,2522.64) ; v1(5235.24,2498.03) 5235.24,2588.89 BT1.2@5243.11,2596.77 ; v1(5762.8,2505.91) BT1.2@5762.8,2596.77
  Mid Layer 2 w25: v1(3741.14,2522.64) 3743.11,2524.61 4603.35,2524.61 4681.1,2602.36 5130.91,2602.36 v1(5235.24,2498.03) 5243.11,2505.91 v1(5762.8,2505.91)
VBUS: C10.1 J1.A4_B9 J1.B4_A9 R9.2 R29.2 U12.1 | length 725.8
  Top Layer w12: R9.2@3120,2370 3148.54,2370 3167.15,2351.39 3167.15,2332.85 3247.35,2252.65 U12.1@3247.35,2188.19
  Top Layer w20: J1.B4_A9@2927.56,2493.31 2927.56,2446.76 2939.27,2435.04 3104.82,2435.04 3116.54,2446.76 ; J1.A4_B9@3116.54,2493.31 3116.54,2446.76 ; 3128.94,2420.28 3116.54,2432.68 3116.54,2446.76 ; R29.2@3219.49,2393.7 3219.49,2422.24 3270.67,2473.43 C10.1@3320.87,2473.43
VIN: C1.2 C2.2 C3.2 C8.2 C11.1 C15.2 C16.2 MOSFET2.5 MOSFET2.6 MOSFET2.7 MOSFET2.8 R3.2 R28.2 R29.1 U12.22 U13.8 U13.10 U14.7 U14.8 U14.9 U14.10 U17.1 U17.2 U17.14 U18.4 U19.4 U20.4 U21.4 U22.4 U23.4 | length 603.1
  Top Layer w10: U18.4@1684.8,1275.59 1725.39,1275.59 v1(1729.33,1279.53) ; v1(2315.98,2435) U13.8@2352.3,2435 ; U13.10@2352.3,2395.63 2355.77,2395.63 2355.99,2395.4 2355.99,2333.69 R3.2@2359.69,2330 v1(2359.69,2300.75) ; U19.4@2558.81,1291.34 2595.47,1291.34 v1(2604.33,1300.2) v1@2605.32,1299.21 ; C8.2@2655.51,2728.35 2655.51,2727.36 2661.42,2721.46 R28.2@2661.42,2685.04 v1(2695.87,2685.04) ; U12.22@3313,2214.48 3313,2224.48 3318.69,2230.16 3318.69,2233.21 3324.54,2239.06 3324.54,2261.55 v1(3325.91,2262.92) ; v1(3331.69,2374.02) R29.1@3331.69,2393.7 ; U20.4@3661.17,1283.46 3668.17,1290.46 3690.07,1290.46 v1(3694.88,1295.28) ; U21.4@4527.31,1287.4 4552.17,1287.4 v1(4562.01,1297.24) ; U17.1@4987.2,2237.4 4996.14,2237.4 5000.98,2242.24 U17.2@5000.98,2275.79 ; U22.4@5641.49,1279.53 5667.32,1279.53 v1(5683.07,1295.28) ; U23.4@6535.19,1271.65 6560.04,1271.65 v1(6571.85,1283.46)
  other v1: 4703.74,2081.69 4796.26,2083.66 5021.95,2085.62 4680.12,2101.38 4702.76,2117.13 5108.27,2120.08 5127.95,2135.83 4679.13,2136.81 4701.77,2149.61 5107.28,2152.56 5126.97,2168.31 4678.15,2169.29 4701.77,2180.12 5107.28,2183.07 5126.97,2198.82 4678.15,2199.8 4700.79,2211.61 5106.3,2214.57 5125.98,2230.32 4677.17,2231.3
  other v2: 2783.46,2319.88 2813.98,2319.88 2762.8,2345.47 2794.29,2345.47 2825.79,2345.47 2776.57,2374.02 2807.09,2374.02 2838.58,2374.02 962.23,2378.51 1010.46,2379.49 986.84,2401.15 1034.45,2400.59 2760.83,2401.57 2789.37,2401.57 2818.9,2401.57 2849.17,2401.94 962.23,2410.01 1010.46,2410.99 987.2,2431.1 1034.45,2431.1 962.23,2440.52 1010.46,2441.5 1035.07,2462.17 987.2,2462.6 962.23,2471.03 1010.46,2472.01 1035.07,2492.68 986.84,2493.67 961.61,2500 1009.84,2500.98 1034.45,2521.65 986.22,2522.64
VSEL0: R13.2 U12.9 | length 64.9
  Top Layer w5: U12.9@3313,2063.48 3313,2033.45 3323.76,2022.7 v1(3323.76,2003.03)
VSEL1: R12.2 U12.7 | length 60.8
  Top Layer w5: U12.7@3273.63,2063.48 v1(3273.63,2002.85) R12.2@3273.76,2002.72
VSEL2: R14.2 U12.11 | length 69.3
  Top Layer w5: U12.11@3352.37,2063.48 3352.37,2039.36 3363.47,2028.27 3363.47,2013.33 v1(3373.76,2003.03)
pads on no net: *.7 *.8 *.9 J1. J1.A6 J1.A7 J1.A8 J1.B6 J1.B7 J1.B8 U1.3 U1.4 U1.5 U1.7 U1.8 U1.9 U1.31 U1.32 U1.33 U1.55 U2.25 U2.26 U2.48 U2.49 U2.50 U2.52 U2.53 U2.54 U2.55 U12.2 U12.4 U12.5 U12.8 U12.10 U12.14 U12.18 U12.19 U12.21 U14.2 U14.11 U17.3 U17.4 U17.5 U17.6 U17.10 U17.11 U17.13 U18.1

## Polygon pours and split planes (outlines as drawn)
GND on Top Layer "NONET_L01_P-001" (solid, remove dead copper, pour order 23): 930.12,2793.31 7195.87,2793.31 7195.87,807.09 7186.02,797.24 925.2,797.24
VBUS on Top Layer "NONET_L01_P-001" (solid, pour order 14): 3067.91,2347.44 3067.91,2395.67 3046.26,2417.32 3046.26,2435.04 3165.35,2435.04 3187.99,2457.68 3251.97,2457.68 3251.97,2326.77 3238.19,2312.99 3065.94,2312.99
170V on Top Layer "NONET_L01_P-001" (solid, pour order 2): 940,1800 1025,1800 1045,1780 1125,1780 1125,1865 1160,1900 1265,1900 1265,2095 940,2095
NetCR1_1 on Top Layer "NONET_L01_P-001" (solid, pour order 1): 1305,2075 1360,2130 1515,2130 1515,2020 1410,1915 1305,1915
VIN on Top Layer "NONET_L01_P-001" (solid, pour order 17): 3013.3,2300 3013.1,2300.2 2773.62,2300.2 2743.11,2330.71 2743.11,2426.18 2894.68,2426.18 2924.21,2396.65 3012.8,2396.65
NetMOSFET1_5 on Top Layer "NONET_L01_P-001" (solid, pour order 15): 3082,2094.5 3082,2185.5 3063.98,2203.52 3063.98,2283.46 3187.01,2283.46 3196.85,2273.62 3196.85,2105.32 3186.02,2094.49
VIN on Top Layer "NONET_L01_P-001" (solid, pour order 7): 4959.65,2245.08 4959.65,2227.36 5000.98,2186.02 5000.98,2062.01 5018.7,2044.29 5146.65,2044.29 5146.65,2247.11
VIN on Top Layer "NONET_L01_P-001" (solid, pour order 5): 4664.37,2247.05 4855.31,2247.05 4855.31,2219.49 4817.91,2182.09 4817.91,2062.99 4800.2,2045.28 4664.37,2045.28
3V3 on Top Layer "NONET_L01_P-001" (solid, pour order 8): 4855.31,2398.62 4669.29,2398.62 4669.29,2581.69 4772.64,2581.69 4814.96,2539.37 4814.96,2432.09 4830.71,2416.34 4857.28,2416.34
3V3 on Top Layer "NONET_L01_P-001" (solid, pour order 9): 4959.65,2399.61 4959.65,2419.29 4996.06,2455.71 4996.06,2537.4 5045.28,2586.61 5126.97,2586.61 5128.94,2584.65 5128.94,2399.61
NetMOSFET1_1 on Top Layer "NONET_L01_P-001" (solid, pour order 16): 3046.26,2121.06 2954.72,2121.06 2922.24,2153.54 2922.24,2264.76 2987.2,2264.76 2987.2,2203.74 3005.91,2185.04 3046.26,2185.04
SW_SRC on Top Layer "NONET_L01_P-001" (solid, pour order 3): 2165,2290 2165,2625 2240,2700 2350,2700 2350,2600 2305,2600 2285,2580 2285,2290
NetQ1_2 on Top Layer "NONET_L01_P-001" (solid, pour order 4): 2360,2695 2470,2695 2470,2570 2360,2570
VIN on Top Layer "NONET_L01_P-001" (solid, pour order 0): 940,2590 1350,2590 1380,2620 1535,2620 1535,2300 1540,2295 940,2295
170V on Bottom Layer "NONET_L01_P-001" (solid, pour order 19): 1189.96,1468.5 938.98,1468.5 944.88,1474.41 944.88,2083.66 1641.34,2083.66 1866.73,1858.27 6586.61,1858.27 6596.46,1848.43 6596.46,1617.13 1364.17,1617.13 1217.52,1470.47
VIN on Bottom Layer "NONET_L01_P-001" (solid, pour order 21): 949.8,2132.87 950.79,2133.86 1673.23,2133.86 1874.02,1933.07 1875.98,1935.04 6595.13,1935.04 6669.29,1860.88 6669.29,1586.61 6456.69,1374.02 933.07,1374.02 933.07,787.4 943.9,798.23 7217.52,798.23 7217.52,2805.12 7204.72,2817.91 7191.93,2805.12 936.02,2805.12
3V3 on Bottom Layer "NONET_L01_P-001" (solid, pour order 18): 3606.45,2197.83 4390.75,2197.83 4599.41,2406.5 5062.99,2406.5 5535.43,1934.06 5785.43,1934.06 5785.43,2290.35 5487.2,2588.58 4669.29,2588.58 4339.57,2258.86 3606.45,2258.86
3V3 on Bottom Layer "NONET_L01_P-001" (solid, pour order 13): 2311.02,2024.61 2310.04,2025.59 2310.04,2205.71 2460.63,2205.71 2513.78,2258.86 2514.76,2257.87 2769.68,2257.87 2769.68,1939.96 2718.5,1888.78 2345.47,1888.78 2311.02,1923.23
GND on Mid Layer 2 "NONET_L01_P-001" (solid, pour order 24): 930.12,2795.28 7203.74,2795.28 7198.82,2790.35 7198.82,800.2 935.04,800.2 930.12,805.12
3V3 on Mid Layer 2 "NONET_L01_P-001" (solid, pour order 22): 2739.17,2256.89 2938.98,2256.89 3009.84,2186.02 3015.75,2191.93 3540.35,2191.93 3608.27,2259.84 3609.25,2258.86 3742.13,2258.86 3742.13,2199.8 3743.11,2198.82 3646.65,2102.36 2937.01,2102.36 2840.55,2198.82 2838.58,2196.85 2738.19,2196.85
GND on Mid Layer 1 "NONET_L01_P-001" (solid, remove dead copper, pour order 11): 933.07,2783.46 944.88,2795.28 7192.91,2795.28 7192.91,787.4 7181.1,799.21 933.07,799.21

## Keep-outs
Top Layer:
  region: 3392.72,2783.46 3392.72,2543.31 4545.28,2543.31 4545.28,2783.46
  lines w10: 946.41,1793.38 947.1,1792.69 1024.17,1792.69 1043.17,1773.68 1127.5,1773.68 1135.83,1782 1135.83,1867.71 1162.41,1894.29 1267.47,1894.29 1270.92,1897.75 1270.92,2098.88 1268.85,2100.96 948.14,2100.96 ; 1300.67,2075 1300.67,1906.5 1401.5,1906.5 1514.76,2019.76 1514.76,2133.06 1356.94,2133.06 1300.67,2076.79
Mid Layer 1:
  circle w10: c4485.24,1274.61 r360.32
  circle w10: c6485.24,1254.92 r360.32
  circle w10: c5596.46,1253.94 r360.32
  circle w10: c3615.16,1271.65 r360.32
  circle w10: c2509.84,1270.67 r360.32
  circle w10: c1640.75,1262.8 r360.32
  region: 3391.45,2781.97 3391.45,2541.81 4544.01,2541.81 4544.01,2781.97
Mid Layer 2:
  region: 3392.43,2783.93 3392.43,2543.78 4544.99,2543.78 4544.99,2783.93
Bottom Layer:
  region: 3392.72,2783.46 3392.72,2543.31 4545.28,2543.31 4545.28,2783.46

## Other copper
Top Layer:

## Silkscreen, mask and mechanical layers (free items; w line width, h text height)
Top Overlay:
  text "Nixie Clock v2.0" at 4762.2,2705.81 h45
  text "Baseboard" at 4807.2,2660.77 h45

## Text inside footprints (layer, text, board x,y; h text height)
J1: Top 3D Body "PCB EDGE" at 2817.32,2755.12 h24 r180
U12: Top 3D Body "*" at 3280.85,2163.19 h50
U14: Top 3D Body "*" at 2129.5,2073.71 h50 r180
U18: Top 3D Body "*" at 1606.8,1250.41 h50
U19: Top 3D Body "*" at 2480.81,1266.15 h50
U20: Top 3D Body "*" at 3583.17,1258.28 h50
U21: Top 3D Body "*" at 4449.31,1262.22 h50
U22: Top 3D Body "*" at 5563.49,1254.34 h50
U23: Top 3D Body "*" at 6457.19,1246.47 h50